# Altium PCB editor-v2.PcbDoc
Units mm, origin at the board's own origin, x right, y up, seen from the top; angles counter-clockwise.
Board outline 40 x 30 mm, 2 copper layers (Top Layer, Bottom Layer), stack 0 mm thick; 1 components, 2 nets, 3 pads, 1 vias.
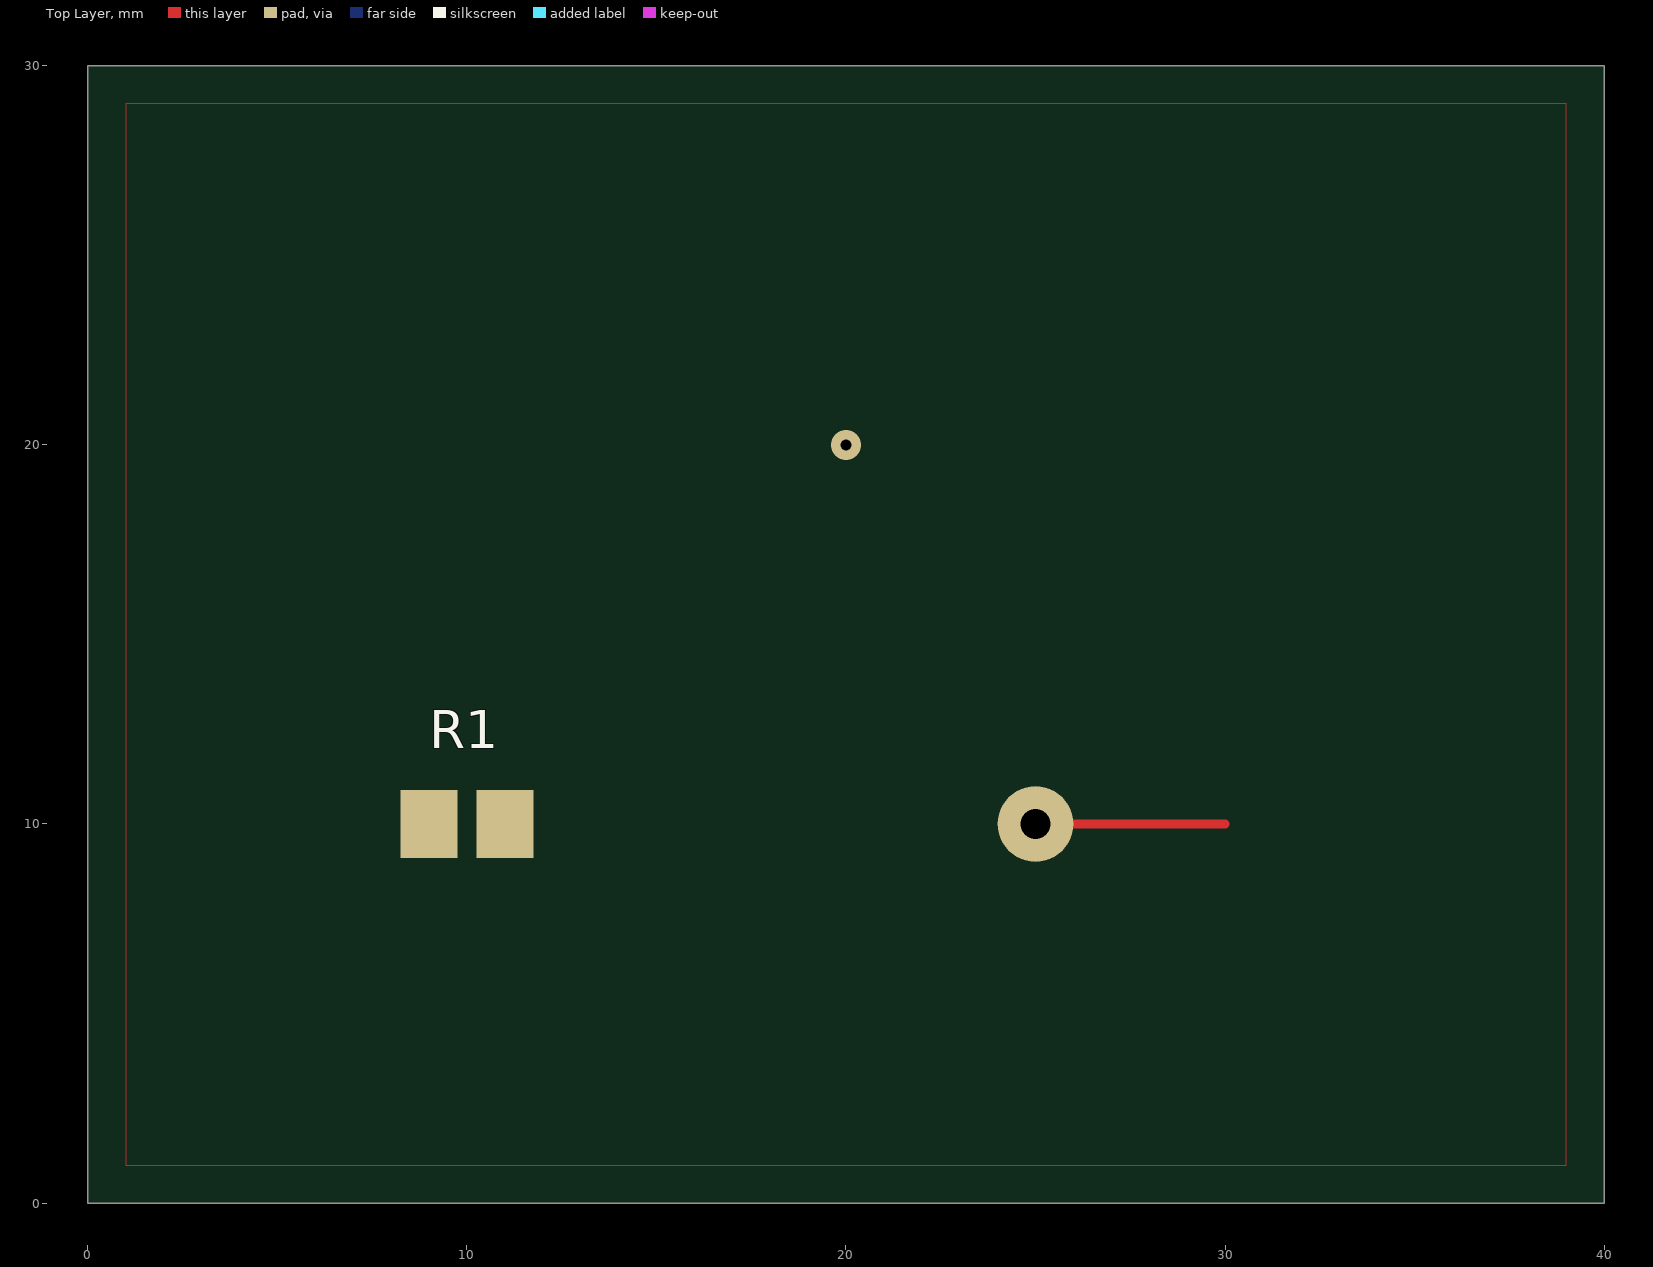
[diagram p0: Top Layer view]
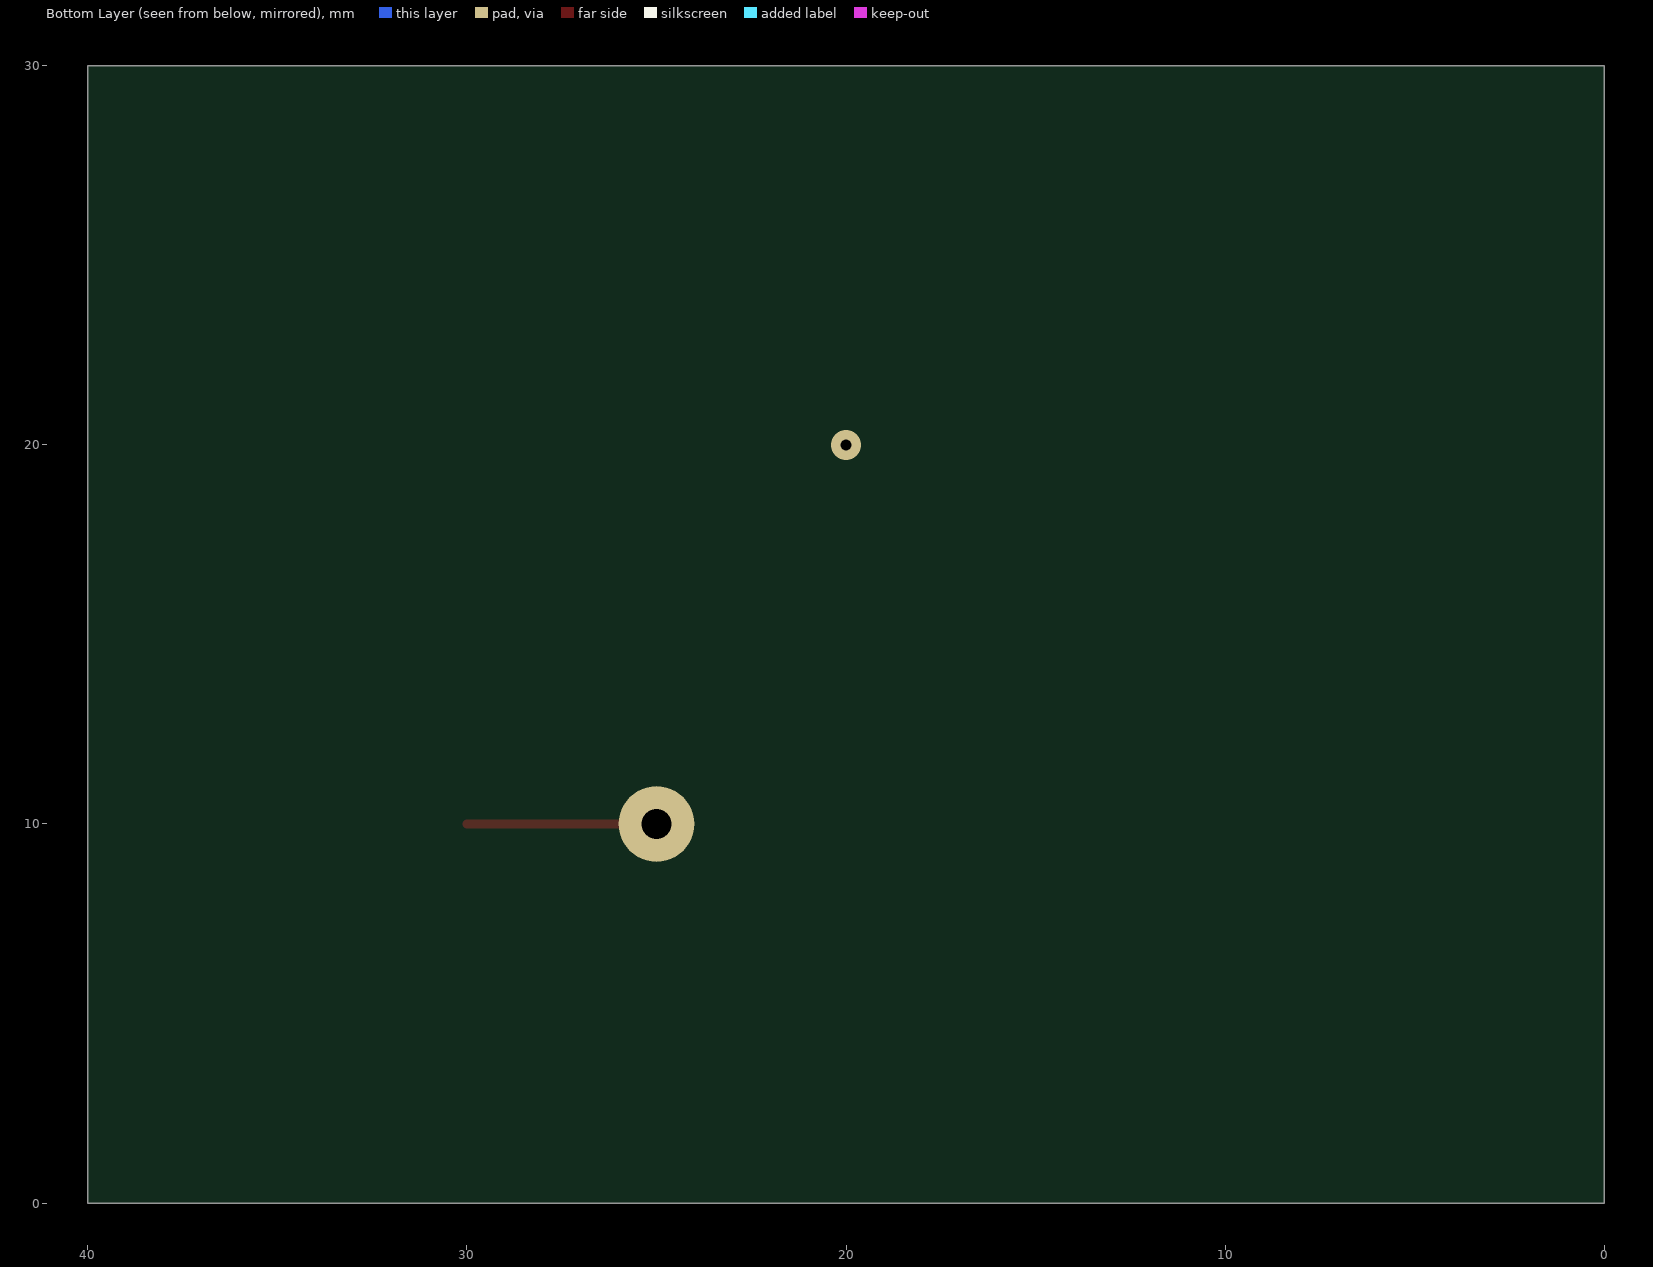
[diagram p1: Bottom Layer view, seen from below]

## Layer stack, top to bottom
Top Layer: signal copper (thickness not stored)
Bottom Layer: signal copper (thickness not stored)

## Board outline
0,0 40,0 40,30 0,30

## Components (designator, comment, footprint, x,y, rotation, side; value= is the part's Value field where it differs from the comment)
R1 "" 0805 10,10 r0 top

## Footprints (in the part's own frame and the unit in brackets; to place one, negate y for a bottom-side part, rotate by r counter-clockwise, add the part's x,y. Pads: shape width x height; smd on the part's side, far side on the other; paste and mask are expansions set on the pad)
0805 [mm]
  rect 1.5x1.8 smd: 1(-1,0) 2(1,0)

## Free pads (board coordinates)
  round 2 hole 0.8: J1.1(25,10)

## Via types
v1: diameter 0.8, hole 0.3, Top Layer to Bottom Layer, 1 vias

## Nets (pads, with @x,y where several pads share a name; then routed paths per layer and width w, separated by ;. In a path a pad name is that pad's centre, name@x,y a point inside that pad or via, vN(x,y) a via of type N, cw(c..) or ccw(c..) an arc to the next point about the centre after c; other vN are vias at no path point)
GND: R1.2
  other v1: 20,20
SIGNAL: pad.J1.1 R1.1 | length 5
  Top Layer w0.25: pad.J1.1 30,10

## Polygon pours and split planes (outlines as drawn)
GND on Top Layer "Ground Top" (solid, pour order 0): 1,1 39,1 39,29 1,29

## Other copper
Top Layer:
  pour cut-out: 15,14 18,14 18,17 15,17